# Altium PCB PCB4270Z_A00.PcbDoc (part 2 of 3)
Units mm, origin at the board's own origin, x right, y up, seen from the top; angles counter-clockwise.
Board outline 32 x 51 mm, 4 copper layers (Top Layer, Signal Layer 2, Signal Layer 3, Bottom Layer), stack 1.6 mm thick; 106 components, 90 nets, 404 pads, 564 vias.
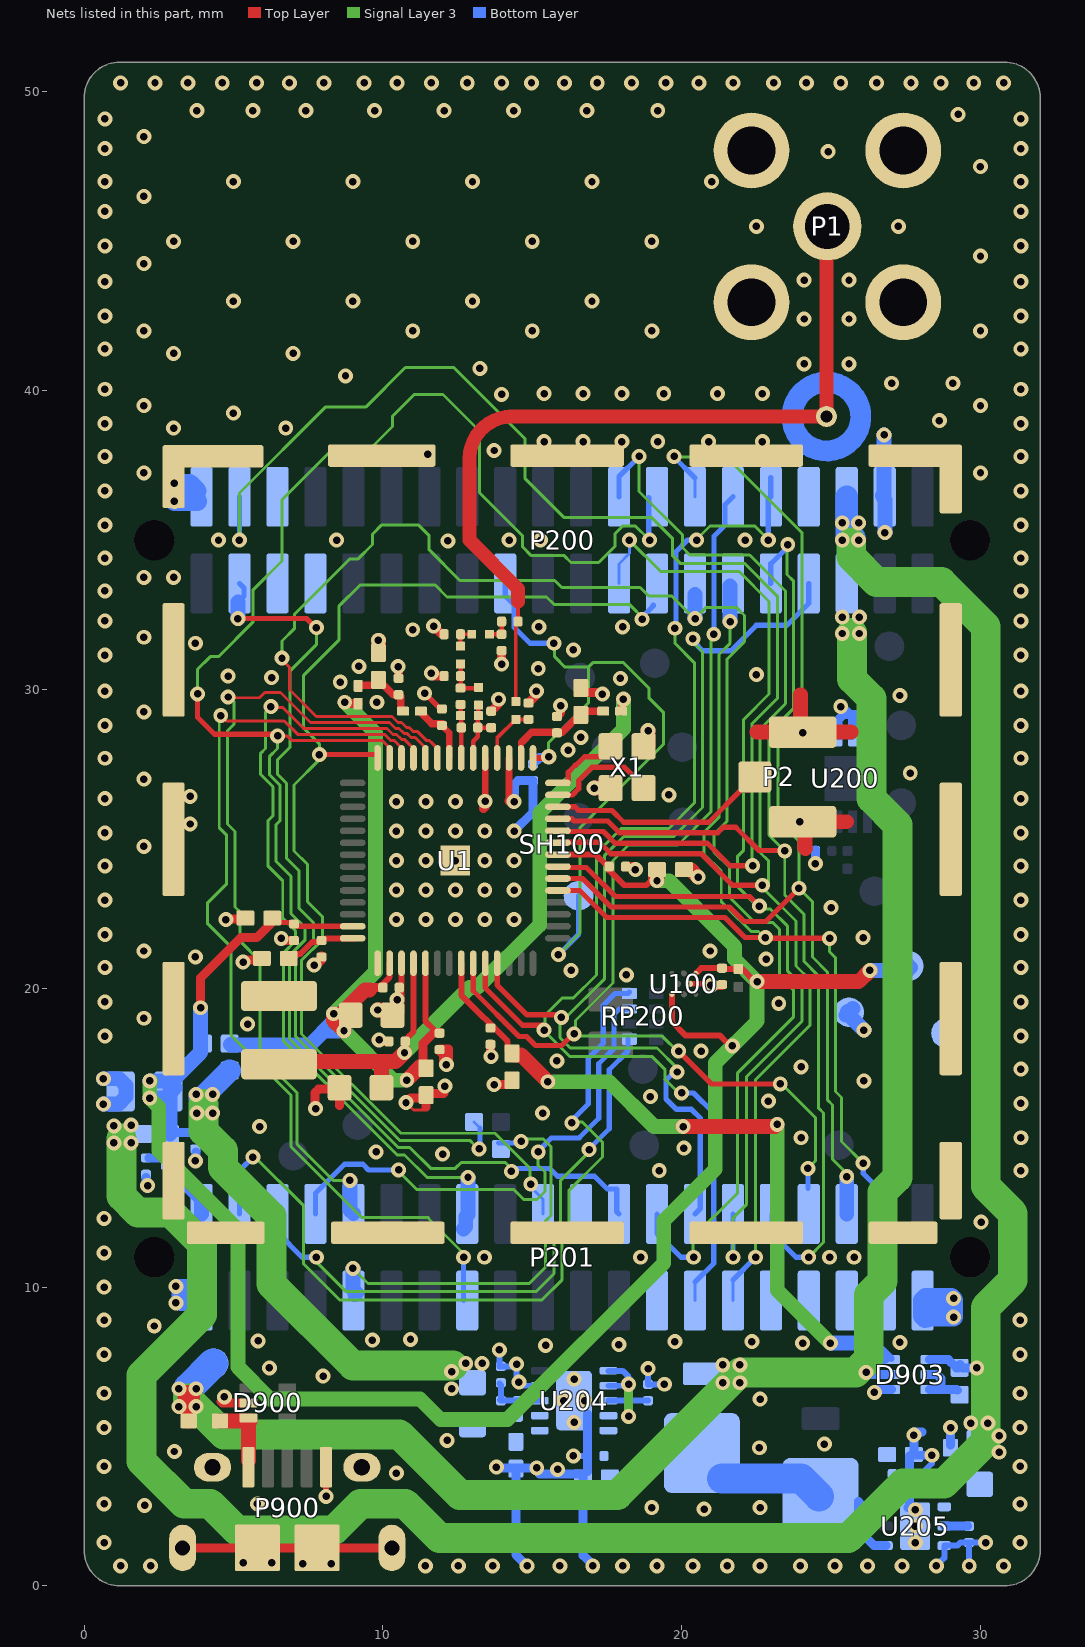
[diagram p4: the nets of this part, all layers, seen from the top]

## Via types
v1: diameter 0.5, hole 0.25, Top Layer to Bottom Layer, tented both sides, 540 vias
v2: diameter 0.508, hole 0.25, Top Layer to Bottom Layer, tented both sides, 22 vias
v3: diameter 0.5/0/0/0.5 (per signal layer), hole 0.25, Top Layer to Bottom Layer, tented both sides, 2 vias

## Nets (pads, with @x,y where several pads share a name; then routed paths per layer and width w, separated by ;. In a path a pad name is that pad's centre, name@x,y a point inside that pad or via, vN(x,y) a via of type N, cw(c..) or ccw(c..) an arc to the next point about the centre after c; other vN are vias at no path point) (continued)
GND: C102.2 C103.2 C105.2 C106.2 C107.2 C110.2 C111.2 C112.2 C113.2 C114.2 C115.2 C116.2 C117.2 C118.2 C119.2 C120.2 C121.2 C122.2 C123.2 C124.2 C200.2 C201.2 C203.2 C205.2 C207.2 C253.2 C254.2 C255.2 C257.2 C258.2 C259.2 C260.2 C261.2 CF1.2 CF2.2 CF3.2 CM1.2 CR1.2 D900.2 D903.1 P1.2 P1.3 P1.4 P1.5 P2.2 P2.3 P200.2 P200.38 P201.1 P201.39 P900.5 P900.6 P900.7 P900.8 P900.9 P900.10 P900.11 R246.1 SH100.1 TP1.2 TPJ13.1 U1.0 U1.17 U1.19 U1.45 U100.B2 U200.2 U200.3 U200.4 U204.4 U204.11 U205.3 U205.7 X1.2 X1.4 | length 86.3
  Top Layer w0.1: v1(10.775,16.175) 11.025,15.925 11.45,15.925
  Top Layer w0.175: U100.B2@20.275,20.15 v1@20.8,20.15
  Top Layer w0.18: v1@11.508,29.762 C107.2@11.927,29.343
  Top Layer w0.2: v1(8.1,3) P900.5@8.1,3.975 ; C110.2@10.625,20.075 U1.45@10.625,20.84 ; v1@20.8,20.15 v1@20.825,20.125
  Top Layer w0.22: v1@13.411,26.246 v1(13.425,26.26)
  Top Layer w0.23: v1(13.425,26.26) U1.19@13.425,27.71 ; v1@14.225,26.275 U1.17@14.225,27.71
  Top Layer w0.3: P900.8@3.3,1.275 P900.10@5.8,1.275 P900.11@7.8,1.275 10.125,1.275 P900.9@10.3,1.1 ; v1@4.599,6.2 4.724,6.325 v1(4.7,6.325) ; v1@4.6,6.2 4.575,6.175 4.625,6.125 D900.2@5.5,6.125 ; v1@4.825,22.325 C117.2@5.425,22.325 ; v1@5.3,20.85 5.4,20.95 5.9,20.95 C123.2@5.95,21 ; v1@6.55,21.675 6.625,21.6 C116.2@7.025,21.6 ; v1(7.7,20.775) 7.875,20.95 C122.2@7.95,20.95 ; v1@7.725,15.95 7.725,16.5 7.849,16.624 8.499,16.624 C120.2@8.55,16.675 8.55,16.075 ; v1@7.725,20.75 7.75,20.75 C122.2@7.95,20.95 ; C122.2@7.95,21.075 C122.2@7.95,21.05 C122.2@7.95,20.95 ; v1@9.775,18.275 9.825,18.225 C121.2@10.125,18.225 ; v1@10.426,19.626 10.441,19.626 10.425,19.642 v1@10.575,19.792 ; v1@10.45,30.825 v1(10.51,30.765) 10.525,30.75 C106.2@10.525,30.375 ; C111.2@10.475,19.075 10.575,19.175 v1@10.575,19.792 ; C110.2@10.575,20.05 v1@10.575,19.792 ; v1@10.925,16.325 11.3,16.325 C113.2@11.45,16.475 ; 11.45,16.025 C113.2@11.45,16.425 C113.2@11.45,16.475 ; v1(11.625,30.55) 11.725,30.45 CF1.2@12.05,30.45 ; v1(11.7,32.125) 11.975,31.85 CF2.2@12.05,31.85 ; C112.2@11.89,17.915 12.025,17.78 ; C112.2@11.9,17.975 12.2,17.975 12.2,17.65 v1@12.125,17.575 ; v1@12.025,17.45 12.025,17.78 ; v1@12.05,16.725 12.05,16.5 12.025,16.475 C113.2@11.45,16.475 ; v1@12.05,17.5 v1@12.125,17.575 ; v1(12.125,17.45) v1@12.125,17.575 ; v1@13.375,26.025 13.425,26.075 v1(13.425,26.26) ; v1@13.6,17.725 C118.2@13.6,18.075 ; CM1.2@13.625,29.275 13.875,29.525 v1(13.875,29.675) ; v1@13.775,16.775 14.175,16.775 C119.2@14.325,16.925 ; v1(13.975,30.85) CF3.2@13.975,31.3 ; v1@14.225,26.275 v1@14.325,26.175 ; CR1.2@14.875,29.55 15.14,29.815 v1(15.14,29.949) ; C103.2@15.825,29.1 15.95,29.225 v1(15.95,29.464) ; C102.2@16.575,29.9 v1@17.25,29.9 ; C114.2@18.125,24.075 18.4,24.075 v1@18.5,23.975 ; v1@18.427,23.975 v1(18.45,23.975) ; v1(20.975,20.1) 20.975,20.102 20.951,20.126 20.95,20.125 20.925,20.1 C124.2@21.35,20.1 ; 12.025,17.78 12.125,17.68 v1@12.125,17.575
  Top Layer w0.5: v1(9.825,19.275) 9.975,19.275 C111.2@10.1,19.15 ; C105.2@9.85,31.2 v1(9.85,31.65) ; v2(17.075,26.7) 17.45,26.7 17.525,26.775 X1.2@17.575,26.725 ; X1.4@18.825,28.075 18.875,28.125 v2(18.875,28.625) ; C115.2@20.025,23.975 20.3,23.975 v1@20.525,23.75 ; 22.525,28.575 P2.3@24.05,28.575 ; 23.975,29.825 23.975,28.65 P2.3@24.05,28.575 ; 24.15,24.675 24.125,24.7 P2.2@24.125,25.5 ; P2.2@24.175,25.45 P2.2@24.125,25.5 ; 25.525,25.575 P2.2@24.05,25.575 P2.2@24.125,25.5 ; 25.675,28.575 P2.3@24.05,28.575
  Bottom Layer w0.2: v2@13.85,7.925 13.9,7.875 13.9,7.35 14.475,7.35 14.475,6.9 v1(14.55,6.825) ; v1@14.55,6.775 14.625,6.7 U204.4@15.25,6.7 ; v1@16.275,4.35 C254.2@16.85,4.35 ; v1@18.85,7.225 18.875,7.2 C255.2@18.875,6.75 19.375,6.75 v1@19.4,6.725 ; v1(26.45,6.475) v1@26.55,6.575 ; C261.2@27.6,3.75 27.625,3.75 28.025,3.75 28.375,4.1 v1@28.375,4.3 ; v1(28.525,0.675) 28.79,0.94 U205.3@28.79,1.35 29.225,1.35 29.325,1.45 C259.2@29.615,1.45 ; v1@29.6,0.75 29.615,0.765 C259.2@29.615,1.45 ; v1@30.15,1.425 30.125,1.45 C259.2@29.615,1.45
  Bottom Layer w0.3: v1@2.075,13.55 C201.2@2.075,13.675 ; C203.2@3.75,14.525 3.75,14.25 v1(3.725,14.225) v1@3.775,14.175 ; v1@13.925,3.95 v1(15.15,3.95) ; v1@14.4,25.275 15.025,25.9 C207.2@15.025,26.95 14.525,26.95 14.4,26.825 v1@14.4,26.275 ; C257.2@14.45,3.925 14.45,1.05 v1@14.8,0.7 ; v1@15.15,3.85 15.25,3.75 16.6,3.75 C253.2@16.7,3.65 16.7,1.025 v1@17,0.725 ; C253.2@16.85,3.825 C254.2@16.85,4.35 U204.11@16.85,5.75 ; v1(17.025,0.675) v1@17.025,0.7 ; v1(24.475,24.175) C200.2@24.475,24.625 ; U200.2@25.225,28.475 25.225,28.975 25.413,29.162 26.037,29.162 26.225,28.975 U200.4@26.225,28.475 ; v1@25.312,29.538 25.312,29.488 25.725,29.075 U200.3@25.725,28.475 ; v1@26.55,6.575 D903.1@27.025,6.575 ; U205.7@27.575,2.625 27.625,2.675 27.625,3.75 27.625,4.35 27.65,4.375 27.675,4.35 27.7,4.375 v1(28.375,4.375) ; C260.2@27.775,4.5 27.775,5.15 28.05,5.15 ; C258.2@29,4.725 v1(29,5.3)
  Bottom Layer w0.5: v1(0.65,16.125) 1.15,16.125 1.4,16.375 1.4,16.75 1.175,16.975 v1(0.65,16.975) ; TPJ13.1@25.5,19.1 TPJ13.1@25.6,19.1 ; TPJ13.1@25.55,19.225 25.6,19.175 TPJ13.1@25.6,19.1 ; v1(26.1,18.6) TPJ13.1@25.6,19.1 ; P200.38@26.725,36.5 26.775,36.55 v1(26.775,38.525) ; P200.38@26.775,36.375 26.8,36.35 v1(26.8,35.25)
  Bottom Layer w0.508: TPJ13.1@25.6,19.2 TPJ13.1@25.725,19.325
  Bottom Layer w0.635: v1(3.025,36.3) 3.796,36.3 3.798,36.302 P200.2@3.8,36.3 ; v1@3.1,36.9 3.535,36.9 P200.2@3.785,36.65 ; P201.39@28.065,9.55 28.925,9.55 v1@29.025,9.65 ; P201.39@28.065,9.55 28.165,9.65 v1@29.025,9.65 ; P201.39@28.065,9.55 28.065,9.035 28.15,8.95 28.2,9 28.225,8.975 28.25,9 v1(29.1,9) 29.1,9.575 v1@29.025,9.65 ; v1@3.25,9.525 3.25,9.95 3.935,9.95 3.935,9.525 v1@3.25,9.525
  other v1: 1.225,0.675 2.225,0.675 11.425,0.675 12.525,0.675 13.675,0.675 14.825,0.675 15.925,0.675 18.025,0.675 19.175,0.675 20.375,0.675 21.525,0.675 22.625,0.675 23.975,0.675 25.125,0.675 26.225,0.675 27.375,0.675 29.625,0.675 30.775,0.675 7.325,0.75 8.275,0.75 5.325,0.775 6.275,0.775 0.675,1.45 27.825,1.45 30.175,1.45 31.325,1.45 27.825,2 27.825,2.55 20.75,2.575 19,2.625 22.625,2.625 2.025,2.7 0.675,2.75 5.8,2.75 31.325,2.75 10.45,3.775 15.85,3.9 13.8,3.975 0.675,4 31.325,4 16.375,4.35 3.025,4.5 22.6,4.625 24.775,4.75 12.15,4.875 27.775,5.05 0.675,5.3 31.325,5.3 16.4,5.475 16.05,6.2 16.75,6.2 22.625,6.25 0.675,6.45 31.325,6.45 19.425,6.75 16.4,6.925 8,7.025 18.875,7.275 6.2,7.3 14.475,7.425 0.675,7.75 31.325,7.75 15.45,8.05 17.9,8.075 24.05,8.125 27.3,8.15 19.775,8.175 22.35,8.175 5.825,8.2 9.65,8.225 10.925,8.25 2.35,8.7 0.675,8.9 31.325,8.9 3.075,9.475 29.1,9.625 0.675,10 3.075,10.025 13.4,11 18.625,11 24.95,11 25.775,11 0.675,11.15 30.025,12.175 0.675,12.3 2.125,13.4 19.25,13.9 31.35,13.9 12,14.45 9.775,14.525 20.075,14.65 24,15 31.35,15 5.875,15.376 15.35,15.825 7.75,15.975 31.35,16.15 22.9,16.225 18.95,16.375 12.075,16.725 13.725,16.775 26.101,16.902 31.35,17.3 24,17.375 15.825,17.575 13.625,17.725 20.65,17.9 9.875,18.275 0.7,18.4 31.35,18.4 5.475,18.8 2,19 23.25,19.5 0.7,19.55 31.35,19.55 10.476,19.626 18.15,20.45 16.3,20.6 0.7,20.7 31.35,20.7 5.325,20.876 22.825,20.975 3.725,21.05 2,21.25 20.95,21.25 6.6,21.675 26.075,21.7 0.7,21.8 31.35,21.8 4.75,22.3 10.454,22.304 11.439,22.304 12.425,22.304 13.411,22.304 14.396,22.304 25.001,22.702 0.7,22.95 31.35,22.95 10.454,23.289 11.439,23.289 12.425,23.289 13.411,23.289 14.396,23.289 20.55,23.725 0.7,24.1 31.35,24.1 10.454,24.275 11.439,24.275 12.425,24.275 13.411,24.275 14.396,24.275 2,24.75 0.7,25.2 31.35,25.2 10.454,25.26 11.439,25.26 12.425,25.26 13.411,25.26 14.396,25.26 3.55,25.5 10.454,26.246 11.439,26.246 12.425,26.246 14.396,26.246 0.7,26.35 31.35,26.35 3.55,26.425 2,27 27.65,27.2 0.7,27.7 31.35,27.7 16.2,27.975 16.625,28.4 0.7,28.8 31.35,28.8 2,29.25 25.325,29.425 9.8,29.575 27.3,29.8 17.35,29.85 11.4,29.875 0.7,29.95 31.35,29.95 8.575,30.25 17.95,30.375 6.275,30.4 4.825,30.45 22.5,30.5 15.2,30.7 9.2,30.775 0.7,31.15 31.35,31.15 16.375,31.325 3.725,31.55 2,31.75 11,32 15.225,32.1 18.025,32.1 0.7,32.3 31.35,32.3 0.7,33.3 31.35,33.3 2.001,33.752 3,33.75 0.7,34.4 31.35,34.4 12.175,34.975 4.5,35 8.45,35 14.225,35 15.276,35.002 22.125,35 0.7,35.5 31.35,35.5 0.7,36.65 31.35,36.65 3.025,36.9 2.001,37.252 30.001,37.252 0.7,37.8 31.35,37.8 11.501,37.877 13.725,38 15.4,38.3 16.7,38.3 18,38.3 19.2,38.3 20.9,38.3 22.7,38.3 3.001,38.752 6.75,38.75 0.7,38.9 31.35,38.9 28.625,39 5,39.25 2.001,39.502 30.001,39.502 13.975,39.875 15.4,39.9 16.7,39.9 18,39.9 19.4,39.9 21.2,39.9 22.7,39.9 0.7,40.05 31.35,40.05 27.025,40.25 29.075,40.25 8.75,40.5 13.25,40.75 24.1,40.9 25.6,40.9 3,41.25 7,41.25 0.7,41.4 31.35,41.4 2.001,42.002 11,42 15,42 19.001,42.002 30.001,42.002 24.1,42.4 25.6,42.4 0.7,42.5 31.35,42.5 5,43 9,43 13,43 17,43 0.7,43.65 31.35,43.65 24.1,43.7 25.6,43.7 2.001,44.252 30.001,44.502 0.7,44.85 31.35,44.85 3,45 7,45 11,45 15,45 19,45 22.5,45.5 27.25,45.5 0.7,46 31.35,46 2.001,46.502 0.7,47 5,47 9,47 13,47 17,47 21,47 31.35,47 30,47.5 24.9,48 0.7,48.1 31.35,48.1 2.001,48.502 0.7,49.1 31.35,49.1 29.25,49.25 3.775,49.375 5.65,49.375 7.425,49.375 9.725,49.375 12.05,49.375 14.375,49.375 16.825,49.375 19.2,49.375 1.225,50.3 2.375,50.3 3.475,50.3 4.625,50.3 5.775,50.3 6.875,50.3 8.025,50.3 9.375,50.3 10.475,50.3 11.625,50.3 12.825,50.3 13.975,50.3 14.975,50.3 16.075,50.3 17.175,50.3 18.325,50.3 19.475,50.3 20.575,50.3 21.725,50.3 23.075,50.3 24.175,50.3 25.325,50.3 26.525,50.3 27.675,50.3 28.675,50.3 29.775,50.3 30.775,50.3
  other v2: 13.9,7.9 23.95,25.575 19.575,26.475 24.05,28.55
NetC102_1: C102.1 C103.1 L102.2 U1.16 | length 3.8
  Top Layer w0.2: U1.16@14.625,27.71 14.625,28.25 14.825,28.45
  Top Layer w0.25: 14.675,28.275 14.975,28.575 16.002,28.575 16.575,29.148 C102.1@16.575,29.2 ; C102.1@16.7,29.3 16.725,29.275 L102.2@17.375,29.275
NetC105_1: C105.1 C106.1 L103.2 L105.1 | length 2
  Top Layer w0.25: L103.2@9.175,30.15 10.025,30.15 10.35,29.825 C106.1@10.525,29.825 ; C106.1@10.6,29.775 10.6,29.325 L105.1@10.625,29.3
NetC107_1: C107.1 L105.2 U1.22 | length 2.2
  Top Layer w0.22: C107.1@12,28.862 12,28.781 12.225,28.556 U1.22@12.225,27.71
  Top Layer w0.25: L105.2@11.25,29.25 11.638,28.862 C107.1@12,28.862
NetC122_1: C122.1 C123.1 U1.42 | length 2.3
  Top Layer w0.2: C123.1@7.05,21.075 7.05,21.15 7.242,21.15 7.642,21.55 7.95,21.55 8.075,21.675 U1.42@8.99,21.675 U1.42@9.09,21.675
NetC253_1: C253.1 C254.1 C260.1 C261.1 D901.1 D902.1 U204.6 U204.7 U204.9 U204.10 U205.4 U205.6 | length 9.4
  Signal Layer 3 w0.3: v2(18.225,5.675) v2(18.225,6.75) v2@18.225,6.775
  Bottom Layer w0.2: U204.7@17.55,6.7 18.225,6.7 v2(18.225,6.75) 18.225,7 18.025,7.2 U204.6@17.55,7.2
  Bottom Layer w0.3: U205.4@26.84,1.35 26.44,1.35 25.915,1.875 25.915,2.825 26.09,2.65 U205.6@26.84,2.65
  Bottom Layer w1: D901.1@21.35,3.6 24,3.6 D902.1@24.6,3
NetC255_1: C255.1 U204.8 | length 1.3
  Bottom Layer w0.2: U204.8@17.55,6.2 17.554,6.204 18.871,6.204 C255.1@18.875,6.2
NetC256_1: C256.1 C257.1 R245.2 R247.1 U204.1 U204.2
NetC256_2: C256.2 R245.1 R246.2 U204.3 | length 1.9
  Bottom Layer w0.2: R246.2@13.9,6.775 13.95,6.725 13.95,6.25 R245.1@13.925,6.225 ; R245.1@13.95,6.2 C256.2@14.525,6.2 U204.3@15.25,6.2
NetC258_1: C258.1 R248.1 U205.1
NetC259_1: C259.1 U205.2 | length 0.8
  Bottom Layer w0.3: U205.2@28.79,2 C259.1@29.565,2
NetCC1_1: CC1.1 CF3.1 LF2.2 | length 0.8
  Top Layer w0.152: LF2.2@13.575,31.85 CF3.1@13.975,31.85 CC1.1@13.975,32.275
NetCC1_2: CC1.2 LR1.2 P1.1 TP1.1 | length 28
  Top Layer w0.125: LR1.2@14.45,29.6 14.45,32.2 CC1.2@14.525,32.275 14.525,32.934
  Top Layer w0.457: 14.26,39.135 14.31,39.135 ; 14.525,32.934 14.525,33.375 12.9,35 12.9,37.725 cw(c14.31,37.725) 14.31,39.135 ; P1.1@24.845,45.5 TP1.1@24.845,39.135 14.31,39.135
NetCF1_1: CF1.1 CM2.2 LF1.1 LM2.2 | length 1.4
  Top Layer w0.152: LF1.1@12.6,30.85 CF1.1@12.6,30.45 CM2.2@12.6,30.05 13.175,30.05 LM2.2@13.2,30.075
NetCF2_1: CF2.1 LF1.2 LF2.1 | length 0.8
  Top Layer w0.125: LF1.2@12.6,31.45 CF2.1@12.6,31.85 LF2.1@12.975,31.85
NetCM1_1: CM1.1 CP1.2 LM1.2 LM2.1 U1.20 | length 2.3
  Top Layer w0.152: U1.20@13.025,27.71 13.025,28.275 13.175,28.425 CP1.2@13.175,28.725 ; LM2.1@13.2,29.475 LM1.2@13.2,29.125 13.175,29.1 CP1.2@13.175,28.725 ; CM1.1@13.625,28.725 CP1.2@13.175,28.725
NetCM2_1: CM2.1 CP1.1 LM1.1 U1.21 | length 1.8
  Top Layer w0.152: CM2.1@12.6,29.5 LM1.1@12.6,29.125 12.625,29.1 CP1.1@12.625,28.725 U1.21@12.625,27.71
NetCR1_1: CR1.1 LR1.1 U1.18 | length 2
  Top Layer w0.125: U1.18@13.825,27.71 13.825,28.375 LR1.1@14.45,29 CR1.1@14.875,29
NetD900_3: D900.3 L901.1 P900.1 | length 2.2
  Top Layer w0.5: L901.1@4.55,5.525 D900.3@5.4,5.525 ; P900.1@5.5,4.195 5.5,5.475 D900.3@5.55,5.525
NetD903_5: D903.5 D903.6 R243.2 | length 1.7
  Bottom Layer w0.3: D903.5@28.275,7.075 28.55,7.075 28.675,6.95 ; D903.6@28.3,6.575 29.2,6.575 R243.2@29.225,6.55 ; 28.675,6.675 28.675,6.95
NetL101_1: L101.1 U1.43
NetP2_1: P2.1 U1.12 | length 7.6
  Top Layer w0.175: U1.12@15.86,26.075 16.425,26.075 16.552,25.947 17.67,25.947 18.06,25.558 20.908,25.558 22,26.65 22.25,26.65 P2.1@22.6,27
NetU1_13: U1.13 X1.3 | length 3.7
  Top Layer w0.175: U1.13@15.86,26.475 U1.13@16.15,26.475 ; X1.3@18.575,26.85 18.575,26.912 18.087,27.4 17,27.4 16.558,26.958 16.558,26.683 16.35,26.475 ; U1.13@16.15,26.475 16.35,26.475 ; U1.13@16.15,26.475 16.35,26.475
NetU1_14: U1.14 X1.1 | length 2.3
  Top Layer w0.175: U1.14@15.825,26.875 U1.14@15.86,26.875 16.208,26.875 16.208,27.233 16.439,27.464 16.463,27.464 16.749,27.75 16.875,27.75 17.525,27.75 X1.1@17.55,27.775
USB_VBUS: D901.2 D903.2 L901.2 P200.35 TPJ20.1 | length 54.7
  Top Layer w0.5: 3.475,6.4 3.5,6.375 3.5,6.35 L901.2@3.5,5.525
  Signal Layer 3 w1: 3.475,6.275 4.675,5.075 10.55,5.075 12.575,3.05 17.85,3.05 21.95,7.15 25.825,7.15 26.263,7.588 26.263,9.737 26.725,10.2 26.725,13.175 27.225,13.675 27.225,25.475 26.35,26.35 26.35,29.7 25.7,30.35 25.7,31.9
  Bottom Layer w0.3: v1(26.175,7.15) 26.2,7.125 26.15,7.075 D903.2@27.025,7.075
  Bottom Layer w1: 3.5,6.325 3.5,6.625 TPJ20.1@4.325,7.45
  other v1: 3.175,6 3.75,6 3.175,6.6 3.75,6.6 21.375,6.8 21.95,6.8 21.375,7.4 21.95,7.4 25.375,31.875 25.95,31.875 25.375,32.425 25.95,32.425
USB_VREG: D903.4 P200.36 R202.2 R243.1 R248.2 | length 82.1
  Signal Layer 3 w1: 1.25,14.975 1.25,13.05 1.8,12.5 2.9,12.5 3.95,11.45 3.95,9.075 1.925,7.05 1.925,4.175 3.35,2.75 4.225,2.75 5.125,1.85 8.35,1.85 9.25,2.75 10.75,2.75 11.9,1.6 25.575,1.6 27.4,3.425 28.775,3.425 30.175,4.825 30.175,6.375 ; 25.676,34.927 25.674,34.453 26.518,33.604 28.695,33.596 30.175,32.106 30.175,13.375 31.081,12.469 31.081,10.231 30.175,9.325 30.175,6.4
  Bottom Layer w0.3: D903.4@28.3,7.575 28.925,7.575 R243.1@29.2,7.3 ; R243.1@29.25,7.3 29.325,7.375 29.4,7.3 v1(29.875,7.3) ; R243.1@29.313,7.412 R243.1@29.338,7.387
  Bottom Layer w0.75: v1@25.525,35.1 v1@25.775,35.1 ; v1@25.525,35.12 P200.36@25.525,36.45
  other v1: 30.625,4.475 30.625,5.025 29.675,5.45 30.25,5.45 1,14.825 1.575,14.825 1,15.4 1.575,15.425 25.375,35 25.925,35 25.375,35.575 25.925,35.575
V_IOVDD2: C118.1 C119.1 D903.3 U1.50 | length 23.7
  Top Layer w0.2: U1.50@12.625,20.84 12.625,19.775 14.175,18.225 C119.1@14.175,17.9
  Top Layer w0.5: C119.1@14.425,17.775 14.625,17.775 v1(15.525,16.875) ; v1(20.051,15.376) 23.126,15.376 v1(23.2,15.45)
  Signal Layer 3 w0.5: v1(15.525,16.875) 17.575,16.875 19.074,15.376 v1(20.051,15.376) ; v1(23.2,15.45) 23.2,9.9 v1(24.975,8.125)
  Bottom Layer w0.2: 26.825,7.825 27.025,7.625 D903.3@27.025,7.6
  Bottom Layer w0.5: v1(24.975,8.125) 26.325,8.125 D903.3@26.775,7.675
VDCDC: C120.1 C121.1 L101.2 L102.1 U1.46 | length 23.2
  Top Layer w0.2: 10.88,18.405 10.775,18.3 11.025,18.55 U1.46@11.025,20.84
  Top Layer w0.3: v1(10.725,17.85) 10.75,17.875 C121.1@10.75,18.225 ; L102.1@17.95,29.275 18.025,29.35 18.025,29.75 17.95,29.675 v2(18.05,29.675)
  Top Layer w0.5: L101.2@7.65,17.55 10.35,17.55 ; C120.1@9.95,16.675 9.95,17.425 10,17.475 ; 10.1,17.55 10.425,17.55 v1(10.725,17.85)
  Signal Layer 3 w0.5: v1(10.725,17.85) 12.9,20.025 13.15,20.025 15.25,22.125 15.25,25.875 18.05,28.675 v2(18.05,29.675)
VDD: C110.1 C111.1 C112.1 C113.1 L103.1 R210.2 R211.2 U1.44 U1.47 | length 29
  Top Layer w0.2: C110.1@9.925,20.025 9.925,20.075 10.225,20.375 U1.44@10.225,20.84 ; U1.47@11.425,20.81 11.425,18.9 11.712,18.612 ; U1.47@11.425,20.84 U1.47@11.425,20.855
  Top Layer w0.3: v1(8.725,29.575) 8.775,29.525 L103.1@9.175,29.525 ; 9.55,19.95 9.625,20.025 C110.1@9.925,20.025 ; C113.1@11.35,17.575 11.35,18.162 11.713,18.525 C112.1@11.9,18.525
  Top Layer w0.5: v1(8.35,19.15) 8.35,18.925 v1@8.662,18.613 ; C111.1@8.55,19.1 9.4,19.95 9.55,19.95 ; v1(8.7,18.575) 8.7,19.025 C111.1@8.75,19.075 ; v1(10.801,16.926) 11.275,17.4 C113.1@11.35,17.4
  Signal Layer 3 w0.5: v1@8.55,18.725 v1(8.7,18.575) 10.35,16.925 v1(10.801,16.926) ; v1@8.675,18.6 8.35,18.925 v1(8.35,19.15) 9.75,20.55 9.75,28.55 v1(8.725,29.575)
  Bottom Layer w0.5: R210.2@4.9,18.125 4.925,18.1 7.55,18.1 8.35,18.9 ; 8.05,18.575 8.075,18.6 8.1,18.575 v1@8.575,18.575 ; v1(8.35,19.15) 8.35,18.9 ; v1(8.7,18.575) v1@8.575,18.575 ; 8.35,18.9 8.35,18.8 v1@8.575,18.575
VLDO_3V6: R211.1 R247.2 | length 15.6
  Signal Layer 3 w1: 4,16.125 4,15.225 4.65,14.575 4.65,14 6.275,12.375 6.275,10.1 9,7.375 v1@12.35,7.375
  Bottom Layer w0.75: v1@3.875,16.3 v1@3.875,16.325 ; 4.025,16.25 4.025,16.406 4.869,17.25 R211.1@4.875,17.25
  other v1: 12.3,6.6 12.3,7.175 12.775,7.45 13.325,7.45 3.775,15.825 4.3,15.825 3.75,16.45 4.3,16.45
VMCU: C114.1 C115.1 C116.1 C117.1 C124.1 C203.1 C205.1 R103.2 R201.1 R202.1 R210.1 TPJ11.1 U1.8 U1.41 U100.A1 U100.E3 | length 73.2
  Top Layer w0.175: C117.1@6.125,22.25 C117.1@6.25,22.25 ; C116.1@7,22.175 6.965,22.175 6.94,22.2 6.45,22.2 C117.1@6.4,22.25 ; C116.1@7.05,22.175 7.15,22.075 U1.41@8.99,22.075 ; C117.1@6.25,22.25 6.275,22.25 C117.1@6.4,22.25 ; C117.1@6.25,22.25 6.275,22.275 6.325,22.325 C117.1@6.4,22.25
  Top Layer w0.2: U1.8@15.86,24.475 17.125,24.475 C114.1@17.5,24.1 ; C114.1@17.575,24.075 17.575,23.95 18.075,23.45 18.825,23.45 19.025,23.65 C115.1@19.1,23.725 ; U100.E3@19.675,19.775 19.675,18.875 20.125,18.425 21.275,18.425 v1@21.5,18.2 ; U100.A1@20.5,20.525 20.65,20.675 20.717,20.675 20.725,20.675 ; C124.1@21.325,20.65 21.3,20.675 21.136,20.675 21.015,20.675 ; C124.1@21.375,20.65 R103.2@21.85,20.65 ; R103.2@21.875,20.65 21.925,20.7 22,20.625 22.025,20.65 22.449,20.226 v2(22.526,20.226) ; 20.725,20.675 21.015,20.675 ; 20.725,20.675 21.015,20.675
  Top Layer w0.3: v1(3.9,19.35) 3.9,20.35 5.25,21.7 5.775,21.7 6.275,22.2 6.275,22.25 6.275,22.275 C117.1@6.275,22.325 ; v1@19.025,23.6 19.025,23.65 C115.1@19.025,23.737 ; C115.1@19.075,23.825 19.025,23.775 C115.1@19.025,23.737 ; C115.1@19.2,23.95 19.2,23.912 19.175,23.887 C115.1@19.025,23.737
  Top Layer w0.5: v1(19.175,23.6) C115.1@19.175,23.887 ; v2(22.526,20.226) 25.924,20.226 25.925,20.225 v1(26.3,20.6)
  Signal Layer 3 w0.5: v1@2.224,16.9 v1(2.2,16.9) v1(2.2,16.325) 2.5,16.025 2.5,14.575 5.15,11.925 5.15,7.325 6.225,6.25 11.25,6.25 11.925,5.575 14.175,5.575 19.4,10.8 19.4,12.225 21.125,13.95 21.125,17.5 22.526,18.901 v2(22.526,20.226) ; v1(19.175,23.6) 19.575,23.6 21.775,21.4 21.775,20.975 v2(22.526,20.226)
  Bottom Layer w0.3: R202.1@2.9,15.225 2.95,15.175 C203.1@3.575,15.175
  Bottom Layer w0.5: v1(2.2,16.325) 2.825,16.325 C205.1@2.85,16.3 ; v1(2.2,16.9) C205.1@2.575,16.9 ; C205.1@2.825,16.775 3.9,17.85 v1(3.9,19.35) ; C205.1@2.85,16.475 2.875,16.45 R202.1@2.875,15.125 ; C205.1@2.875,16.5 C205.1@3.05,16.675
  Bottom Layer w0.508: v1(26.3,20.6) 27.2,20.6 27.375,20.775 TPJ11.1@27.5,20.65 ; TPJ11.1@27.6,20.75 TPJ11.1@27.55,20.7 ; TPJ11.1@27.65,20.7 27.6,20.65 TPJ11.1@27.55,20.7 ; TPJ11.1@27.5,20.65 TPJ11.1@27.55,20.7 ; TPJ11.1@27.5,20.65 TPJ11.1@27.55,20.7
  other v1: 21.7,18.075
VMCU_IN: C201.1 P201.2 R201.2 | length 3
  Bottom Layer w0.3: C201.1@2.175,14.325 R201.2@2.925,14.325 ; R201.2@2.825,14.225 R201.2@2.925,14.325 ; R201.2@2.825,14.325 R201.2@2.925,14.325
  Bottom Layer w0.5: R201.2@2.875,14 3.935,12.94 P201.2@3.935,12.45
VRF: TPJ9.1
WSTK_F4: C207.1 P200.17 TPJ17.1 U1.15 | length 25.3
  Top Layer w0.2: U1.15@15.025,27.71 15.51,27.71 v2(15.55,27.75)
  Signal Layer 3 w0.1: v2(15.55,27.75) 15.55,28.225 16.875,29.55 16.875,30.75 ; v1@15.7,21.1 15.85,21.1 16.6,21.85 16.6,25.375 19.4,28.175 19.4,29.225 18.9,29.725 18.9,30.05 18.05,30.9 17.025,30.9 16.875,30.75 ; v1@15.7,31.575 15.75,31.525 15.75,31.1 16.1,30.75 16.875,30.75
  Bottom Layer w0.175: P200.17@14.095,33.55 14.095,33.13 14.4,32.825 14.4,32.075 14.925,31.55 v1(15.725,31.55) ; v1(15.876,21.126) v1@15.876,21.174 ; v1@15.875,21.175 15.8,21.1 15.825,21.075 v1(15.876,21.126) 16.55,21.8 TPJ17.1@16.55,23.1
  Bottom Layer w0.3: C207.1@15.025,27.5 15.25,27.725 v2@15.525,27.725
WSTK_F10: P200.23 P201.30 U1.7 | length 40.1
  Top Layer w0.175: U1.7@15.86,24.075 U1.7@16.15,24.075 ; U1.7@16.15,24.047 16.809,24.047 17.782,23.075 22.277,23.075 v1(22.601,22.751)
  Signal Layer 3 w0.1: v1(18.25,35) 19.3,33.95 21.925,33.95 22.925,32.95 22.925,29.85 22.075,29 22.075,24.625 21.875,24.425 21.875,23.4 22.524,22.751 v1(22.601,22.751) ; v1(21.725,11) 21.725,12.325 22.175,12.775 22.175,17.05 24.025,18.9 24.025,20.1 23.55,20.575 23.55,22.075 22.975,22.65 v1@22.65,22.65
  Bottom Layer w0.1: P200.23@17.905,33.55 17.905,34.205 18.25,34.55 v1@18.25,34.95
  Bottom Layer w0.175: v1@21.715,11.01 P201.30@21.715,12.45
WSTK_F11: P200.24 P201.29 U1.9 | length 42.8
  Top Layer w0.175: U1.9@15.86,24.875 15.874,24.889 17.244,24.889 17.625,24.507 20.642,24.507 21.7,23.45 v1(22.7,23.45)
  Signal Layer 3 w0.1: v1(18.576,37.802) 18.576,36.625 20.025,35.176 20.025,34.75 20.275,34.5 22.275,34.5 23.475,33.3 23.475,29.525 22.625,28.675 22.625,24.55 22.9,24.275 v1@22.9,23.45 ; v1(22.476,11.001) 22.476,16.951 24.3,18.775 24.3,20.275 23.825,20.75 23.825,22.25 22.7,23.375 22.7,23.425 v1@22.712,23.437 ; v1(22.7,23.45) v1@22.8,23.55
  Bottom Layer w0.1: P201.29@21.715,9.55 P201.29@21.715,10.239
  Bottom Layer w0.175: P200.24@17.905,36.45 17.905,37.13 v1@18.55,37.775 ; P201.29@21.715,10.239 v1(22.476,11.001)
WSTK_F12: P200.25 P201.20 U1.28 | length 40.8
  Top Layer w0.1: U1.28@9.825,27.71 U1.28@9.825,27.825
  Top Layer w0.175: v1(7.875,27.825) U1.28@9.825,27.825
  Signal Layer 3 w0.1: v1@14.925,13.45 14.925,13.975 13.749,15.151 10.604,15.151 7.281,18.474 7.281,20.942 7.984,21.645 7.984,22.391 7.475,22.9 7.475,24.15 7.025,24.6 7.025,26.804 7.875,27.654 v1(7.875,27.825) 7.875,28.183 7.35,28.708 7.35,30.475 8.525,31.65 8.525,32.783 9.242,33.5 11.75,33.5 12.15,33.1 15.475,33.1 15.725,32.85 18.25,32.85 18.775,32.325 v1@18.775,32.175
  Bottom Layer w0.1: P201.20@15.1,13.2 15.365,12.935 P201.20@15.365,12.45
  Bottom Layer w0.175: v1(18.676,32.352) 18.676,32.374 18.65,32.4 19.05,32.8 P200.25@19.05,32.825
  other v1: 14.95,13.45
WSTK_F13: P200.26 P201.24 U1.27 | length 61.3
  Top Layer w0.1: v1@6.5,28.476 6.4,28.575 6.325,28.5 6.374,28.451 v1(6.475,28.451) 6.799,28.451 6.95,28.3 9.975,28.3 10.225,28.05 U1.27@10.225,27.71
  Top Layer w0.175: v1@3.775,29.85 3.8,29.825 3.8,29.073 4.373,28.5 v1@6.325,28.5
  Signal Layer 3 w0.1: v1(3.8,29.851) 3.8,30.675 4.225,31.1 4.5,31.1 5.65,32.25 5.65,33.325 6.625,34.3 6.625,36.35 8.188,37.912 9.438,37.912 10.325,38.8 10.325,39.15 ; v1(6.475,28.451) 6.475,28.025 6.2,27.75 6.2,27.153 6.55,26.803 6.55,25.6 6.425,25.475 6.425,24.25 6.925,23.75 6.925,22.5 7.4,22.025 7.4,21.626 6.881,21.108 6.881,18.308 10.514,14.675 10.9,14.675 11.6,13.975 12.425,13.975 12.625,14.175 14.1,14.175 14.301,13.974 v1(14.301,13.876) ; 10.33,39.15 10.33,39.154 11.05,39.875 12.013,39.875 13.235,38.653 13.235,36.59 14.675,35.15 14.675,34.775 14.971,34.479 16.071,34.479 16.3,34.25 17.225,34.25 17.775,34.8 17.775,35.225 18.025,35.475 18.45,35.475 18.872,35.053 v1@18.872,34.978
  Bottom Layer w0.175: v1@14.3,13.925 14.35,13.975 15.58,13.975 15.843,13.713 17.087,13.713 17.513,13.287 17.825,13.287 17.825,12.53 P201.24@17.905,12.45 ; v1@18.9,35.075 P200.26@18.9,36.425
  other v1: 18.925,35
WSTK_F14: P200.27 P201.26 U1.23 | length 55.3
  Top Layer w0.1: v1@6.475,31 6.625,31 6.875,30.75 6.875,30 7.775,29.1 10.306,29.1 10.507,28.899 10.625,28.899 10.791,28.733 10.883,28.733 11.024,28.591 11.166,28.591 11.468,28.29 11.56,28.29 11.65,28.2 11.825,28.025 U1.23@11.825,27.71
  Signal Layer 3 w0.1: v1@6.475,31.1 6.625,31.25 6.625,31.625 7.05,32.05 7.05,32.525 8.9,34.375 9.175,34.375 9.65,34.85 9.65,35.2 9.95,35.5 11.2,35.5 11.55,35.15 11.55,34.675 12.575,33.65 15.75,33.65 15.987,33.413 18.613,33.413 18.897,33.128 19.672,33.128 v1@20.425,32.375 ; v1@20.401,11.1 20.401,11.001 20.375,10.975 20.375,11.65 21.875,13.15 21.875,17.175 23.75,19.05 23.75,19.925 23.275,20.4 23.275,21.975 23.05,22.2 22.45,22.2 21.6,23.05 21.6,24.05 21.075,24.575 21.075,25.15 21.525,25.6 21.525,31.025 22.1,31.6 22.1,32.475 21.825,32.75 20.825,32.75 v1(20.45,32.375)
  Bottom Layer w0.1: P200.27@20.45,33.175 P200.27@20.475,33.2
  Bottom Layer w0.175: P201.26@19.175,12.45 19.175,11.8 19.974,11.001 v1(20.401,11.001)
  Bottom Layer w0.5: v1(20.45,32.375) P200.27@20.45,33.175
  other v1: 6.625,31.05
WSTK_F15: P200.28 P201.36 U1.6 | length 40.2
  Top Layer w0.175: U1.6@15.86,23.675 16.687,23.675 17.637,22.725 21.605,22.725 22.091,22.239 22.813,22.239 v1(23.925,23.35)
  Signal Layer 3 w0.1: v1(19.75,37.8) 19.775,37.775 21.5,37.775 24.025,35.25 24.025,29.2 23.225,28.4 23.225,25.625 23.925,24.925 v1(23.925,23.35) 24.375,22.9 24.375,21.05 24.875,20.55 24.875,16.275 25.05,16.1 25.05,14.277 25.525,13.802 v1(25.525,13.7)
  Bottom Layer w0.1: P200.28@20.445,36.45 P200.28@20.445,37.08
  Bottom Layer w0.175: v1@19.7,37.825 P200.28@20.445,37.08
  Bottom Layer w0.5: P201.36@25.525,12.45 v1(25.525,13.7)
WSTK_F16: P200.29 P201.38 U1.5 | length 33.2
  Top Layer w0.175: U1.5@15.86,23.275 16.592,23.275 17.492,22.375 21.45,22.375 22.125,21.7 22.975,21.7 22.95,21.675 v1(24.95,21.675) ; v2(22.801,21.701) v2@22.974,21.701
  Signal Layer 3 w0.1: v1(21.625,32.275) 21.625,31.55 21.25,31.175 21.25,25.725 20.75,25.225 20.75,24.5 21.325,23.925 21.325,22.9 21.525,22.7 22.325,21.9 22.575,21.9 v2@22.775,21.7 ; v1(24.95,21.675) 24.95,21.225 25.15,21.025 25.15,16.55 25.35,16.35 25.35,14.875 v1(26.075,14.15)
  Bottom Layer w0.1: P201.38@26.795,12.45 P201.38@26.795,13.08
  Bottom Layer w0.175: P200.29@21.625,33.46 P200.29@21.715,33.55 ; v1(26.075,14.15) 26.075,13.8 P201.38@26.795,13.08
  Bottom Layer w0.5: v1(21.625,32.275) P200.29@21.625,33.46
WSTK_F17: P200.30 P201.34 U1.51 | length 38.1
  Top Layer w0.175: U1.51@13.025,20.84 13.025,19.92 14.558,18.388 14.812,18.388 15.112,18.088 15.987,18.088 v1@16.475,18.575 ; v1(19.9,17.9) 21,16.8 v1(23.3,16.8)
  Signal Layer 3 w0.1: v1@16.45,18.475 16.45,18.925 17.7,20.175 17.7,24.275 18.225,24.8 19.875,24.8 20.975,25.9 20.975,31.9 v1@21.025,31.95 ; v1@16.475,18.401 19.349,18.401 19.875,17.875 v1@19.913,17.837 ; v1(23.3,16.8) 23.35,16.8 24.475,15.675 24.475,14.225 v1(24.225,13.975)
  Bottom Layer w0.175: v1@21.083,31.883 21.083,35.133 21.45,35.5 21.45,36.185 P200.30@21.715,36.45 ; v1(24.225,13.975) P201.34@24.228,13.298
  other v1: 16.4,18.475 21.075,31.85
WSTK_F18: P200.31 P201.32 U1.11 | length 37
  Top Layer w0.175: U1.11@15.86,25.675 U1.11@15.887,25.702 ; U1.11@15.925,25.675 16.325,25.675 16.403,25.597 17.525,25.597 17.915,25.208 21.208,25.208 21.388,25.388 21.812,25.388 21.825,25.375 22.583,24.617 23.433,24.617 v1(23.45,24.6)
  Signal Layer 3 w0.1: v1@23.525,34.85 23.525,33.85 23.75,33.625 23.75,29.375 22.925,28.55 22.925,25.125 v1(23.45,24.6) 23.45,23.125 24.1,22.475 24.1,20.9 24.575,20.425 24.575,16 24.75,15.825 24.75,11.502 v1(24.25,11.002)
  Bottom Layer w0.1: P201.32@22.985,11.84 P201.32@22.985,12.45
  Bottom Layer w0.175: P201.32@22.985,11.84 23.823,11.002 v1(24.25,11.002) ; P200.31@22.985,33.55 22.985,34.21 v1@23.47,34.695
  other v1: 23.55,34.85
WSTK_F19: P200.32 P201.27 U1.52 | length 41.9
  Top Layer w0.175: U1.52@13.425,20.84 13.425,20.015 14.677,18.763 v1@15.4,18.763
  Signal Layer 3 w0.1: v1@15.425,18.788 15.425,19.1 16,19.675 16.375,19.675 17.15,20.45 17.15,24.525 17.975,25.35 19.575,25.35 20.425,26.2 20.425,30.9 19.776,31.549 v1(19.776,32.052) ; v1@15.45,18.675 15.45,18.525 16.25,17.725 19,17.725 19.45,17.275 19.45,16.95 19.9,16.5 v1(20,16.5) ; v2@20.5,35.025 20.95,35.475 22.45,35.475 22.9,35.025 v2(22.9,35)
  Bottom Layer w0.1: P201.27@20.445,9.55 P201.27@20.445,10.17
  Bottom Layer w0.175: v1@19.8,32.1 19.808,32.108 19.808,34.61 20.197,35 v2(20.5,35) ; v1(20,16.5) 20.4,16.5 21.078,15.822 21.078,10.803 P201.27@20.445,10.17 ; v2@22.975,35.1 22.9,35.175 22.9,36.365 P200.32@22.985,36.45 P200.32@22.985,37.09
  other v1: 15.4,18.6
WSTK_F20: P200.33 P201.28 U1.53 | length 35.5
  Top Layer w0.175: U1.53@13.825,20.84 13.825,20.11 14.822,19.113 15.837,19.113 v1@15.9,19.05
  Signal Layer 3 w0.1: v1(15.975,19.025) v1@16.025,19.025 ; v1(19.85,17.2) 19.85,17.325 19.175,18 16.275,18 15.925,18.35 15.925,19.125 v1@16.025,19.025 ; v1(20.375,31.7) 20.375,31.6 20.7,31.275 20.7,26.05 19.725,25.075 18.05,25.075 17.425,24.45 17.425,20.325 16.075,18.975 v1@16.025,19.025
  Bottom Layer w0.175: v1@19.775,17.125 19.675,17.125 19.475,16.925 19.475,16.3 19.825,15.95 20.325,15.95 20.625,15.65 20.625,12.63 P201.28@20.445,12.45 ; v1@20.375,31.575 20.425,31.575 20.7,31.3 21.65,31.3 22.5,32.15 23.525,32.15 24.255,32.88 P200.33@24.255,33.55
WSTK_F21: P200.34
WSTK_P1: P201.4 RP200.8 | length 27.9
  Signal Layer 3 w0.1: v1(5.65,14.351) 5.65,14.475 5.65,14.425 7.35,12.725 7.35,10.775 8.55,9.575 15.325,9.575 16,10.25 16,11.655 16.225,11.88 16.225,13.228 17.35,14.353 17.35,14.85 16.675,15.525 v1@16.45,15.525
  Bottom Layer w0.175: P201.4@5.205,12.45 5.205,13.905 v1@5.7,14.4 ; v1(16.326,15.501) 16.35,15.525 16.35,15.598 v1@16.401,15.649 ; v1@16.4,15.65 16.875,16.125 16.875,17.65 17.375,18.15 17.375,19.425 17.775,19.825 18.2,19.825 RP200.8@18.25,19.875
WSTK_P3: P201.6 RP200.5 | length 19.9
  Signal Layer 3 w0.1: v1@7.825,11.05 7.825,10.8 8.775,9.85 15.125,9.85 15.725,10.45 15.725,11.975 15.95,12.2 15.95,13.575 16.875,14.5 v1@16.875,14.6
  Bottom Layer w0.175: P201.6@6.475,12.45 6.475,11.825 7.3,11 ; 7.301,11.001 v1(7.775,11.001) ; v1@16.875,14.6 17.575,15.3 17.575,17.275 18.2,17.9 RP200.5@18.2,18.3
  other v1: 16.9,14.6
WSTK_P5: P201.8 RP200.7 | length 17.7
  Signal Layer 3 w0.1: v1@10.575,13.85 10.608,13.817 10.608,13.792 11.125,13.275 14.375,13.275 14.715,12.935 15.16,12.935 15.425,13.2 15.425,13.85 15.2,14.075 v1(15.2,14.525)
  Signal Layer 3 w0.175: v1@10.475,13.925 v1(10.525,13.925)
  Bottom Layer w0.175: P201.8@7.745,12.45 7.745,13.145 8.713,14.112 9.338,14.112 9.525,13.925 v1(10.525,13.925) ; v1@15.138,14.463 15.188,14.463 15.275,14.55 15.275,14.625 15.638,14.988 16.563,14.988 16.575,15 17.225,15.65 17.225,17.475 17.737,17.987 17.737,19.137 17.9,19.3 18.175,19.3 RP200.7@18.25,19.375
WSTK_P6: P201.9 R216.1 | length 14
  Signal Layer 3 w0.1: v1(9,10.625) 9.5,10.125 14.9,10.125 15.45,10.675 15.45,12.225 15.625,12.4 15.625,14.7 15.375,14.95 14.7,14.95 v1(14.626,14.876) v1@14.776,14.876
  Bottom Layer w0.175: R216.1@13.875,14.825 14.594,14.825 14.626,14.857 v1(14.626,14.876)
  Bottom Layer w0.5: v1(9,10.625) 9,9.926 9.126,9.801 P201.9@9.075,9.75
WSTK_P7: P201.10 U1.24 | length 27
  Top Layer w0.1: v1@4.9,29.725 5.875,29.725 6.05,29.9 6.575,29.9 7.575,28.9 10.224,28.9 10.425,28.699 10.542,28.699 10.708,28.533 10.8,28.533 10.941,28.391 11.084,28.391 11.325,28.15 11.4,28.075 11.4,27.71 U1.24@11.425,27.71
  Signal Layer 3 w0.1: 5.025,29.6 5.025,28.85 4.8,28.625 4.8,25.5 5.05,25.25 5.05,22.725 5.225,22.55 5.225,21.575 5.881,20.919 5.881,17.75 7.125,16.506 7.125,14.784 8.334,13.575 v1(8.9,13.575)
  Bottom Layer w0.1: P201.10@9.015,12.45 P201.10@9.025,12.46
  Bottom Layer w0.5: v1(8.9,13.575) 8.9,12.585 P201.10@9.025,12.46
  other v1: 4.825,29.75
WSTK_P12: P201.15 U1.26 | length 31.6
  Top Layer w0.1: v1(4.575,29.125) 4.75,28.95 6.7,28.95 7.15,28.5 10.058,28.5 10.259,28.299 10.376,28.299 10.425,28.25 10.625,28.05 U1.26@10.625,27.71
  Signal Layer 3 w0.1: v1@4.525,29.075 4.525,25.375 4.775,25.125 4.775,23.5 4.125,22.85 4.125,22.175 4.925,21.375 4.925,18.424 6.925,16.424 6.925,14.701 9.288,12.337 11.525,12.337 ; 11.525,12.3 12.7,11.125 v1(12.7,11)
  Bottom Layer w0.175: P201.15@12.7,9.55 v1@12.7,11.025
WSTK_P13: P201.16 U1.25 | length 27.6
  Top Layer w0.1: v1@6.275,29.4 6.65,29.4 7.35,28.7 10.141,28.7 10.342,28.499 10.459,28.499 10.625,28.333 10.717,28.333 10.85,28.2 11.025,28.025 U1.25@11.025,27.71
  Signal Layer 3 w0.1: 6.075,28.025 5.9,27.85 5.9,27.17 6.325,26.745 6.325,25.775 6.15,25.6 6.15,24.1 6.65,23.6 6.65,22.35 7.075,21.925 7.075,21.584 6.681,21.19 6.681,18.225 10.481,14.425 10.725,14.425 11.475,13.675 v1(12.85,13.675) ; 6.075,28.025 6.075,28.286 6.075,29.25 v1(6.25,29.425)
  Bottom Layer w0.5: P201.16@12.7,11.95 12.775,12.025 12.775,12.35 12.85,12.425 v1(12.85,13.675)
WSTK_P19: P201.22
WSTK_P22: P201.25
WSTK_P28: P201.31
WSTK_P30: P201.33
WSTK_P32: P201.35
WSTK_P34: P201.37
WSTK_P36: P200.3 R217.2 | length 28
  Top Layer w0.175: v1(5.15,32.375) 7.45,32.375 v1@7.775,32.05
  Signal Layer 3 w0.1: v1(7.775,32.075) 7.775,31.5 6.9,30.625 6.9,28.075 6.475,27.65 6.475,27.161 6.775,26.861 6.775,24.35 7.2,23.925 7.2,22.675 7.675,22.2 7.675,21.619 7.081,21.025 7.081,18.391 10.572,14.9 12.925,14.9 13.051,14.774 13.051,14.625 13.201,14.774 13.225,14.75 v1(13.225,14.625)
  Bottom Layer w0.1: R217.2@13.05,15.525 R217.2@13.25,15.325
  Bottom Layer w0.175: P200.3@5.15,32.925 5.354,33.129 5.354,33.4 P200.3@5.205,33.55 ; v1@13.25,14.601 R217.2@13.25,15.325
  Bottom Layer w0.5: v1(5.15,32.375) P200.3@5.15,32.925
WSTK_P37: P200.4 U1.10 | length 43.3
  Top Layer w0.175: U1.10@15.86,25.275 15.887,25.247 17.38,25.247 17.77,24.858 20.867,24.858 21.625,24.1 v2(22.375,24.1)
  Signal Layer 3 w0.1: v2@5.2,35.025 5.2,36.575 8.075,39.45 9.425,39.45 10.75,40.775 12.375,40.775 14.75,38.4 14.75,37.075 16.075,35.75 19,35.75 19.7,35.05 19.7,34.475 19.95,34.225 22.1,34.225 23.2,33.125 23.2,29.7 22.35,28.85 22.35,24.175 22.375,24.15 v2(22.375,24.1)
  Bottom Layer w0.175: v2@5.205,35.12 P200.4@5.205,36.45
  other v2: 5.2,35
WSTK_P38: P200.5
WSTK_P39: P200.6
WSTK_P40: P200.7
pads on no net: D900.1 P200.M1 P200.M2 P201.40 P201.M1 P201.M2 P900.4 RP200.3 RP200.6 U100.C1 U200.9 U204. U204.5 U205. U205.5

## Polygon pours and split planes (outlines as drawn)
GND on Signal Layer 2 "GND_L2" (solid, remove dead copper, pour order 48): 0,0 0,51 32,51 32,0
GND on Top Layer "GND_L1" (solid, remove dead copper, pour order 56): 0,0 0,51 32,51 32,0
GND on Signal Layer 3 "GND_L3" (solid, remove dead copper, pour order 52): 0,0 0,51 32,51 32,0
GND on Bottom Layer "GND_L4" (solid, remove dead copper, pour order 54): 0,0 0,51 32,51 32,0

## Other copper
Top Layer:
  pour cut-out: 14.875,32.725 13.65,32.725 13.65,32.35 11.35,32.35 11.35,26.9 14.875,26.9
  pour cut-out: 16.675,26.563 16.675,26.975 17.075,27.375 17.075,28.525 17.275,28.725 18.325,28.725 18.65,29.05 19.075,29.05 19.3,28.825 19.3,26.175 19.2,26.075 17.163,26.075
  region net NetL101_1: 6.787,19.25 6.787,20.25 7.787,20.25 8.787,21.25 9.825,21.25 9.825,20.425 8.925,20.425 7.75,19.25
  region net USB_VBUS: 3.85,6.85 3.075,6.85 2.925,6.7 2.925,5.9 3.225,5.6 3.7,5.6 4,5.9 4,6.7
  region net EFR32_PD07: 7.525,15.275 7.525,14.775 8.25,15.5 7.75,15.5
  region net EFR32_PD06: 8.625,14.6 8.625,15.1 7.9,14.375 8.4,14.375
  region net NetCC1_2: 14.462,32.575 14.3,32.875 14.3,32.978 14.596,32.978 14.749,32.884 14.605,32.575
  pour cut-out: 7.361,15.25 ccw(c7.775,15.25) 7.775,14.836 ccw(c7.775,15.25) 8.189,15.25 ccw(c7.775,15.25) 7.775,15.664 ccw(c7.775,15.25)
  pour cut-out: 7.961,14.625 ccw(c8.375,14.625) 8.375,14.211 ccw(c8.375,14.625) 8.789,14.625 ccw(c8.375,14.625) 8.375,15.039 ccw(c8.375,14.625)
  pour cut-out: 11.203,30.542 ccw(c11.617,30.542) 11.617,30.128 ccw(c11.617,30.542) 12.031,30.542 ccw(c11.617,30.542) 11.617,30.957 ccw(c11.617,30.542)
  pour cut-out: 10.096,30.765 ccw(c10.51,30.765) 10.51,30.351 ccw(c10.51,30.765) 10.924,30.765 ccw(c10.51,30.765) 10.51,31.179 ccw(c10.51,30.765)
  pour cut-out: 9.436,31.65 ccw(c9.85,31.65) 9.85,31.236 ccw(c9.85,31.65) 10.264,31.65 ccw(c9.85,31.65) 9.85,32.064 ccw(c9.85,31.65)
  pour cut-out: 16.936,29.861 ccw(c17.35,29.861) 17.35,29.447 ccw(c17.35,29.861) 17.764,29.861 ccw(c17.35,29.861) 17.35,30.275 ccw(c17.35,29.861)
  pour cut-out: 15.492,29.451 ccw(c15.906,29.451) 15.906,29.037 ccw(c15.906,29.451) 16.32,29.451 ccw(c15.906,29.451) 15.906,29.865 ccw(c15.906,29.451)
  pour cut-out: 14.718,29.957 ccw(c15.132,29.957) 15.132,29.543 ccw(c15.132,29.957) 15.546,29.957 ccw(c15.132,29.957) 15.132,30.371 ccw(c15.132,29.957)
  pour cut-out: 23.256,45.461 ccw(c24.869,45.461) 24.869,43.848 ccw(c24.836,45.494) 26.481,45.527 ccw(c24.902,45.528) 24.902,47.107 ccw(c24.902,45.461)
  pour cut-out: 11.285,32.115 ccw(c11.699,32.115) 11.699,31.701 ccw(c11.699,32.115) 12.113,32.115 ccw(c11.699,32.115) 11.699,32.529 ccw(c11.699,32.115)
  pour cut-out: 13.55,30.843 ccw(c13.964,30.843) 13.964,30.429 ccw(c13.964,30.843) 14.378,30.843 ccw(c13.964,30.843) 13.964,31.257 ccw(c13.964,30.843)
  pour cut-out: 10.979,29.886 ccw(c11.393,29.886) 11.393,29.472 ccw(c11.393,29.886) 11.807,29.886 ccw(c11.393,29.886) 11.393,30.3 ccw(c11.393,29.886)
Signal Layer 2:
  pour cut-out: 7.361,15.25 ccw(c7.775,15.25) 7.775,14.836 ccw(c7.775,15.25) 8.189,15.25 ccw(c7.775,15.25) 7.775,15.664 ccw(c7.775,15.25)
  pour cut-out: 7.961,14.625 ccw(c8.375,14.625) 8.375,14.211 ccw(c8.375,14.625) 8.789,14.625 ccw(c8.375,14.625) 8.375,15.039 ccw(c8.375,14.625)
  pour cut-out: 23.256,45.461 ccw(c24.869,45.461) 24.869,43.848 ccw(c24.836,45.494) 26.481,45.527 ccw(c24.902,45.528) 24.902,47.107 ccw(c24.902,45.461)
Signal Layer 3:
  region net VLDO_3V6: 13.375,7.125 12.6,6.35 12.2,6.35 12.05,6.5 12.05,7.625 12.3,7.875 13.25,7.875 13.575,7.55 13.575,7.325
  region net USB_VREG: 29.425,5.55 29.575,5.7 30.375,5.7 30.875,5.2 30.875,4.525 30.575,4.225 29.775,4.225 29.425,4.575
  region net 5V: 26.15,6.15 25.375,6.15 25.225,6 25.225,5.2 25.375,5.05 26.15,5.05 26.3,5.2 26.3,6
  region net USB_VBUS: 3.85,6.85 3.075,6.85 2.925,6.7 2.925,5.9 3.075,5.75 3.85,5.75 4,5.9 4,6.7
  region net USB_VBUS: 22.25,7.65 21.275,7.65 21.125,7.5 21.125,6.7 21.275,6.55 22.05,6.55 22.375,6.875 22.375,7.525
  region net USB_VREG: 0.75,15.512 0.75,14.738 1,14.487 1.6,14.487 1.85,14.738 1.85,15.512 1.7,15.662 0.9,15.662
  region net VLDO_3V6: 4.5,15.65 4.5,16.6 4.4,16.7 3.725,16.7 3.5,16.475 3.5,15.731 3.675,15.556 4.406,15.556
  region net USB_VREG: 25.1,35.75 25.25,35.9 26.025,35.9 26.175,35.75 26.175,34.875 26.025,34.725 25.275,34.725 25.1,34.9
  region net USB_VBUS: 26.05,32.7 26.2,32.55 26.2,31.7 25.875,31.375 25.525,31.375 25.125,31.775 25.125,32.55 25.275,32.7
  region net 5V: 27.9,31.35 28.025,31.225 28.025,30.35 27.975,30.3 27.075,30.3 26.95,30.425 26.95,31.2 27.1,31.35
  pour cut-out: 7.361,15.25 ccw(c7.775,15.25) 7.775,14.836 ccw(c7.775,15.25) 8.189,15.25 ccw(c7.775,15.25) 7.775,15.664 ccw(c7.775,15.25)
  pour cut-out: 7.961,14.625 ccw(c8.375,14.625) 8.375,14.211 ccw(c8.375,14.625) 8.789,14.625 ccw(c8.375,14.625) 8.375,15.039 ccw(c8.375,14.625)
  pour cut-out: 23.256,45.461 ccw(c24.869,45.461) 24.869,43.848 ccw(c24.836,45.494) 26.481,45.527 ccw(c24.902,45.528) 24.902,47.107 ccw(c24.902,45.461)
Bottom Layer:
  rectangle net GND: 15.8,4.85 17,7.5
  rectangle net GND: 27.325,0.775 28.325,3.175
  pour cut-out: 18.525,20.075 18.525,17.975 18.9,17.975 18.9,20.075
  region net NetC258_1: 30.375,3.8 30.375,2.5 28.565,2.5 28.565,3.7 28.665,3.8
  region net NetC253_1: 25.725,4.2 26.175,4.65 27.175,4.65 27.175,3.475 27.05,3.35 27.05,2.5 25.725,2.5
  region net NetC256_1: 12.55,5.025 12.55,5.7 12.675,5.825 15.55,5.825 15.55,4.625 15.45,4.525 13.05,4.525
  region net NetC253_1: 19.85,3.125 17.25,3.125 17.25,5.825 19.55,5.825 19.85,5.525
  pour cut-out: 4.25,8.45 4.25,8.725 13.275,8.725 13.275,8.45
  pour cut-out: 18.125,8.725 18.125,8.45 13.675,8.45 13.675,8.725
  pour cut-out: 24.475,10.45 24.475,10.725 26.825,10.725 26.825,10.45
  pour cut-out: 25.45,11.275 25.45,11.55 26.9,11.55 26.9,11.275
  pour cut-out: 10.8,13.363 10.8,13.638 12.5,13.638 12.5,13.363
  region net VLDO_3V6: 13.425,6.45 13.325,6.35 12.2,6.35 12.05,6.5 12.05,7.275 12.475,7.7 13.425,7.7 13.575,7.55 13.575,7.325 13.425,7.175
  region net USB_VREG: 29.525,5.65 29.575,5.7 30.375,5.7 30.875,5.2 30.875,4.525 30.738,4.388 29.612,4.387 29.525,4.475
  region net 5V: 26.15,6.15 25.375,6.15 25.225,6 25.225,5.2 25.375,5.05 26.15,5.05 26.3,5.2 26.3,6
  region net USB_VBUS: 3.85,6.85 3.075,6.85 2.925,6.7 2.925,5.9 3.075,5.75 3.85,5.75 4,5.9 4,6.7
  region net USB_VBUS: 22.05,7.65 21.275,7.65 21.025,7.4 21.025,6.8 21.275,6.55 22.05,6.55 22.2,6.7 22.2,7.5
  region net USB_VREG: 0.9,14.575 1.675,14.575 1.925,14.825 1.925,15.425 1.675,15.675 0.9,15.675 0.75,15.525 0.75,14.725
  region net VLDO_3V6: 4.475,15.625 4.475,16.594 4.369,16.7 3.725,16.7 3.5,16.475 3.5,15.731 3.675,15.556 4.406,15.556
  pour cut-out: 9.125,37.35 9.125,37.625 14.125,37.625 14.125,37.35
  pour cut-out: 5.289,32.375 5.289,32.65 7.625,32.65 7.625,32.375
  pour cut-out: 13.989,34.45 13.989,34.725 16.325,34.725 16.325,34.45
  pour cut-out: 14.175,35.275 14.175,35.55 15.75,35.55 15.75,35.275
  pour cut-out: 16.614,37.35 16.614,37.625 26.4,37.625 26.4,37.35
  pour cut-out: 11.714,34.55 11.714,35.538 13.9,35.538 13.9,34.55
  pour cut-out: 12.382,32.375 12.382,32.65 14.718,32.65 14.718,32.375
  pour cut-out: 12.05,36.332 11.775,36.332 11.775,38.668 12.05,38.668
  pour cut-out: 4.85,37.35 4.85,37.625 7.675,37.625 7.675,37.35
  pour cut-out: 23.925,13.625 23.925,13.35 19.35,13.35 19.35,13.625
  pour cut-out: 20.125,8.425 20.125,8.7 24.575,8.7 24.575,8.425
  region net USB_VREG: 25.1,35.75 25.45,36.1 25.825,36.1 26.175,35.75 26.175,34.825 26.05,34.725 25.275,34.725 25.1,34.9
  region net USB_VBUS: 25.8,33.025 26.2,32.625 26.2,31.7 26.125,31.625 25.275,31.625 25.125,31.775 25.125,32.55 25.6,33.025
  pour cut-out: 22.3,32.375 22.3,32.65 25.15,32.65 25.15,32.375
  region net 5V: 26.95,32.375 28.025,31.3 28.025,30.375 27.95,30.3 27.1,30.3 26.95,30.45
  pour cut-out: 27.137,37.35 27.137,37.625 28.263,37.625 28.263,37.35
  pour cut-out: 7.361,15.25 ccw(c7.775,15.25) 7.775,14.836 ccw(c7.775,15.25) 8.189,15.25 ccw(c7.775,15.25) 7.775,15.664 ccw(c7.775,15.25)
  pour cut-out: 7.961,14.625 ccw(c8.375,14.625) 8.375,14.211 ccw(c8.375,14.625) 8.789,14.625 ccw(c8.375,14.625) 8.375,15.039 ccw(c8.375,14.625)
  pour cut-out: 23.256,45.461 ccw(c24.869,45.461) 24.869,43.848 ccw(c24.836,45.494) 26.481,45.527 ccw(c24.902,45.528) 24.902,47.107 ccw(c24.902,45.461)

## Silkscreen, mask and mechanical layers (free items; w line width, h text height)
Top Overlay:
  text "EFR32xG25" at 1.85,47.4 h3.2
  text "Discrete Match" at 2.2,44.975 h2.54
Bottom Overlay:
  lines w0.15: 1.1,13.8 1.1,14.25 1.275,14.425 ; 1.35,43.95 1.35,42.95 2.35,42.95 ; 1.35,47.95 1.35,48.95 2.35,48.95 ; 2.275,18.425 3.528,17.167 3.525,15.8 ; 3.526,13.951 4.498,13.949 4.675,14.125 ; 19.35,42.95 20.35,42.95 20.35,43.95 ; 19.35,48.95 20.35,48.95 20.35,47.95
  lines w0.152: 1.42,14.938 1.42,14.638 1.72,14.638 ; 1.42,15.338 1.42,15.638 1.72,15.638 ; 2.17,14.638 2.47,14.638 2.47,14.338 ; 2.42,15.538 2.42,15.638 2.67,15.638 ; 2.47,13.988 2.47,13.688 2.77,13.688 ; 3.02,13.688 3.32,13.688 3.32,13.988 ; 3.07,15.638 3.32,15.638 3.32,15.538 ; 3.32,14.638 3.32,14.938 ; 3.425,17.95 3.425,17.65 3.725,17.65 ; 3.425,18.35 3.425,18.65 3.725,18.65 ; 4.075,17.65 4.375,17.65 4.375,17.35 ; 4.375,17 4.375,16.7 4.675,16.7 ; 4.425,18.55 4.425,18.65 4.675,18.65 ; 5.075,16.7 5.375,16.7 5.375,17 ; 5.125,18.65 5.375,18.65 5.375,18.55 ; 5.375,17.65 5.375,17.95 ; 12.5,15.325 12.5,15.025 12.8,15.025 ; 12.5,15.725 12.5,16.025 12.8,16.025 ; 13.15,15.025 13.45,15.025 13.45,14.725 ; 13.45,14.375 13.45,14.075 13.75,14.075 ; 13.5,15.925 13.5,16.025 13.75,16.025 ; 14.15,14.075 14.45,14.075 14.45,14.375 ; 14.2,16.025 14.45,16.025 14.45,15.925 ; 14.45,15.025 14.45,15.325
  text "BOARD INFO" at 20.4,49.3 h1.6
  text "PAVDD / Config." at 10.15,20.025 h1.6
  text "PCB4270Z Rev. A00" at 30.025,19.7 h1.52 r270
  text "VMCU" at 5.825,18.9 h1.2
  text "VMCU Config." at 0.725,17.3 h1.6 r270
  text "PD02" at 17.45,17.075 h1.6
  text "LDO / 3V6" at 5.65,16.85 h1.2 r270
  text "WMCU_IN" at 9.5,16.475 h1.2 r36.53
  text "JOYSTICK" at 15.125,16.25 h1.2
  text "EXP9" at 14.725,14.075 h1.2 r270
  text "USB_VREG" at -0.025,7.975 h1.2 r270
Top Solder:
  lines w0.6: 30.775,0 1.2,0 cw(c1.2,1.2) 0,1.2 0,49.8 cw(c1.2,49.8) 1.2,51 30.8,51 cw(c30.8,49.8) 32,49.8 32,1.2 cw(c30.8,1.2) 30.8,0
Bottom Solder:
  lines w0.6: 30.775,0 1.2,0 cw(c1.2,1.2) 0,1.2 0,49.8 cw(c1.2,49.8) 1.2,51 30.8,51 cw(c30.8,49.8) 32,49.8 32,1.2 cw(c30.8,1.2) 30.8,0
BOARD OUTLINE 1:
  lines w0.1: 30.775,0 1.2,0 cw(c1.2,1.2) 0,1.2 0,49.8 cw(c1.2,49.8) 1.2,51 30.8,51 cw(c30.8,49.8) 32,49.8 32,1.2 cw(c30.8,1.2) 30.8,0
Mechanical 5:
  drawing of 176 lines, arcs and shapes, not listed
  text "TP12" at 27.854,31.479 h0.5
  text "TP2" at 20.002,30.907 h0.5
  text "TP8" at 17.503,30.427 h0.5
  text "TP15" at 28.252,28.827 h0.5
  text "TP6" at 20.922,28.098 h0.5
  text "TP7" at 18.392,28.057 h0.5
  text "TP14" at 28.252,26.229 h0.5
  text "TP5" at 17.452,25.728 h0.5
  text "TP4" at 20.922,25.578 h0.5
  text "TP10" at 27.353,23.277 h0.5
  text "TP17" at 17.452,23.127 h0.5
  text "TP11" at 28.275,20.725 h0.5
  text "TP13" at 26.502,19.228 h0.5
  text "TP9" at 29.754,18.527 h0.5
  text "TP3" at 19.604,17.329 h0.5
  text "TP18" at 10.053,15.449 h0.5
  text "TP1" at 19.652,14.778 h0.5
  text "TP16" at 26.152,14.778 h0.5
  text "TP19" at 7.902,14.428 h0.5
  text "TP20" at 5.243,7.479 h0.5
Mechanical 11:
  the board outline again, w0.1
Mechanical 12:
  lines w0.1: 30.8,51 cw(c30.8,49.8) 32,49.8 32,1.2 cw(c30.8,1.2) 30.8,0 1.2,0 cw(c1.2,1.2) 0,1.2 0,49.8 cw(c1.2,49.8) 1.2,51 30.825,51
Mechanical 15:
  lines w0.025: 70.971,-42.875 71.179,-42.875 ; 71.075,-42.979 71.075,-42.771
  lines w0.1: -0.5,0 0.5,0 ; 0,-0.5 0,0.5
Mechanical 16:
  lines w0.1: -0.5,0 0.5,0 ; 0,-0.5 0,0.5
Mechanical 26:
  lines w0.2: -121.4,-34.25 -119.775,-34.25 ; -121.4,12.425 -119.775,12.425 ; -121.4,59.1 -119.775,59.1 ; -66.75,-82.5 -66.75,-80.9 ; -66.75,105.8 -66.75,107.4 ; -13.725,-82.5 -13.725,-80.9 ; -13.725,105.8 -13.725,107.4 ; 39.3,-82.5 39.3,-80.9 ; 39.3,105.8 39.3,107.4 ; 92.325,-82.5 92.325,-80.9 ; 92.325,105.8 92.325,107.4 ; 145.35,-34.225 146.975,-34.225 ; 145.35,59.125 146.975,59.125 ; 146.975,-82.5 -121.4,-82.5 -121.4,107.4 146.975,107.4 146.975,-82.475 ; -119.775,-80.9 145.35,-80.9 145.35,105.8 -119.775,105.8 -119.775,-80.9
  text "5" at -93.425,106.325 h0.5
  text "4" at -40.4,106.3 h0.5
  text "3" at 12.625,106.3 h0.5
  text "2" at 65.65,106.3 h0.5
  text "1" at 118.775,106.3 h0.5
  text "D" at 146.025,82.2 h0.5
  text "D" at -120.725,82.175 h0.5
  text "C" at 146.025,35.5 h0.5
  text "C" at -120.725,35.475 h0.5
  text "B" at 146.025,-11.175 h0.5
  text "B" at -120.725,-11.2 h0.5
  text "A" at 146.025,-57.825 h0.5
  text "A" at -120.725,-57.85 h0.5
  text "5" at -93.425,-81.975 h0.5
  text "4" at -40.4,-82 h0.5
  text "3" at 12.625,-82 h0.5
  text "2" at 65.65,-82 h0.5
  text "1" at 118.775,-82 h0.5
Mechanical 27:
  drawing of 28 lines, arcs and shapes, not listed
  text "Board Title" at 75.75,-55.95 h2.5
  text ".BoardTitle" at 77.15,-61.5 h3.5
  text "Page Title" at 75.75,-65.675 h2.5
  text "Designed:" at 43.5,-69.425 h1.7
  text "Approved:" at 59.7,-69.425 h1.7
  text "Top Assembly" at 77.15,-69.575 h3.2
  text "TAB" at 45.025,-71.925 h2.2
  text "RGU" at 61.075,-71.925 h2.2
  text "Revision" at 133.65,-72.7 h1.7
  text "Document number" at 75.75,-72.975 h2.35
  text "Size" at 43.5,-74.175 h1.7
  text "BOM Doc. No:" at 48.425,-74.175 h1.7
  text ".BoardRevision" at 133.925,-75.75 h2.7
  text ".BoardName" at 77.15,-75.85 h3.2
  text "A4" at 44.075,-76.025 h2
  text "<>" at 49,-76.025 h2
  text "Design Created Date:" at 43.5,-78.375 h1.7
  text "Sheet Created Date:" at 75.175,-78.375 h1.7
  text "Sheet Modified Date:" at 103.6,-78.375 h1.7
  text "Sheet" at 133.65,-78.375 h1.7
  text "Monday, July 13, 2020" at 44.575,-80.325 h1.7
  text "Monday, July 13, 2020" at 76.3,-80.325 h1.7
  text "'.Print_Date'" at 104.725,-80.325 h1.7
  text "1" at 134.85,-80.325 h1.7
  text "of" at 137.975,-80.325 h1.7
  text "2" at 140.7,-80.325 h1.7